# Altium PCB BOARD_2LAYER.PcbDoc (part 7 of 7)
Units mil, origin at the board's own origin, x right, y up, seen from the top; angles counter-clockwise.
Board outline 7677.17 x 7677.17 mil, 2 copper layers (Top Layer, Bottom Layer), stack 34.252 mil thick; 625 components, 375 nets, 1924 pads, 450 vias.
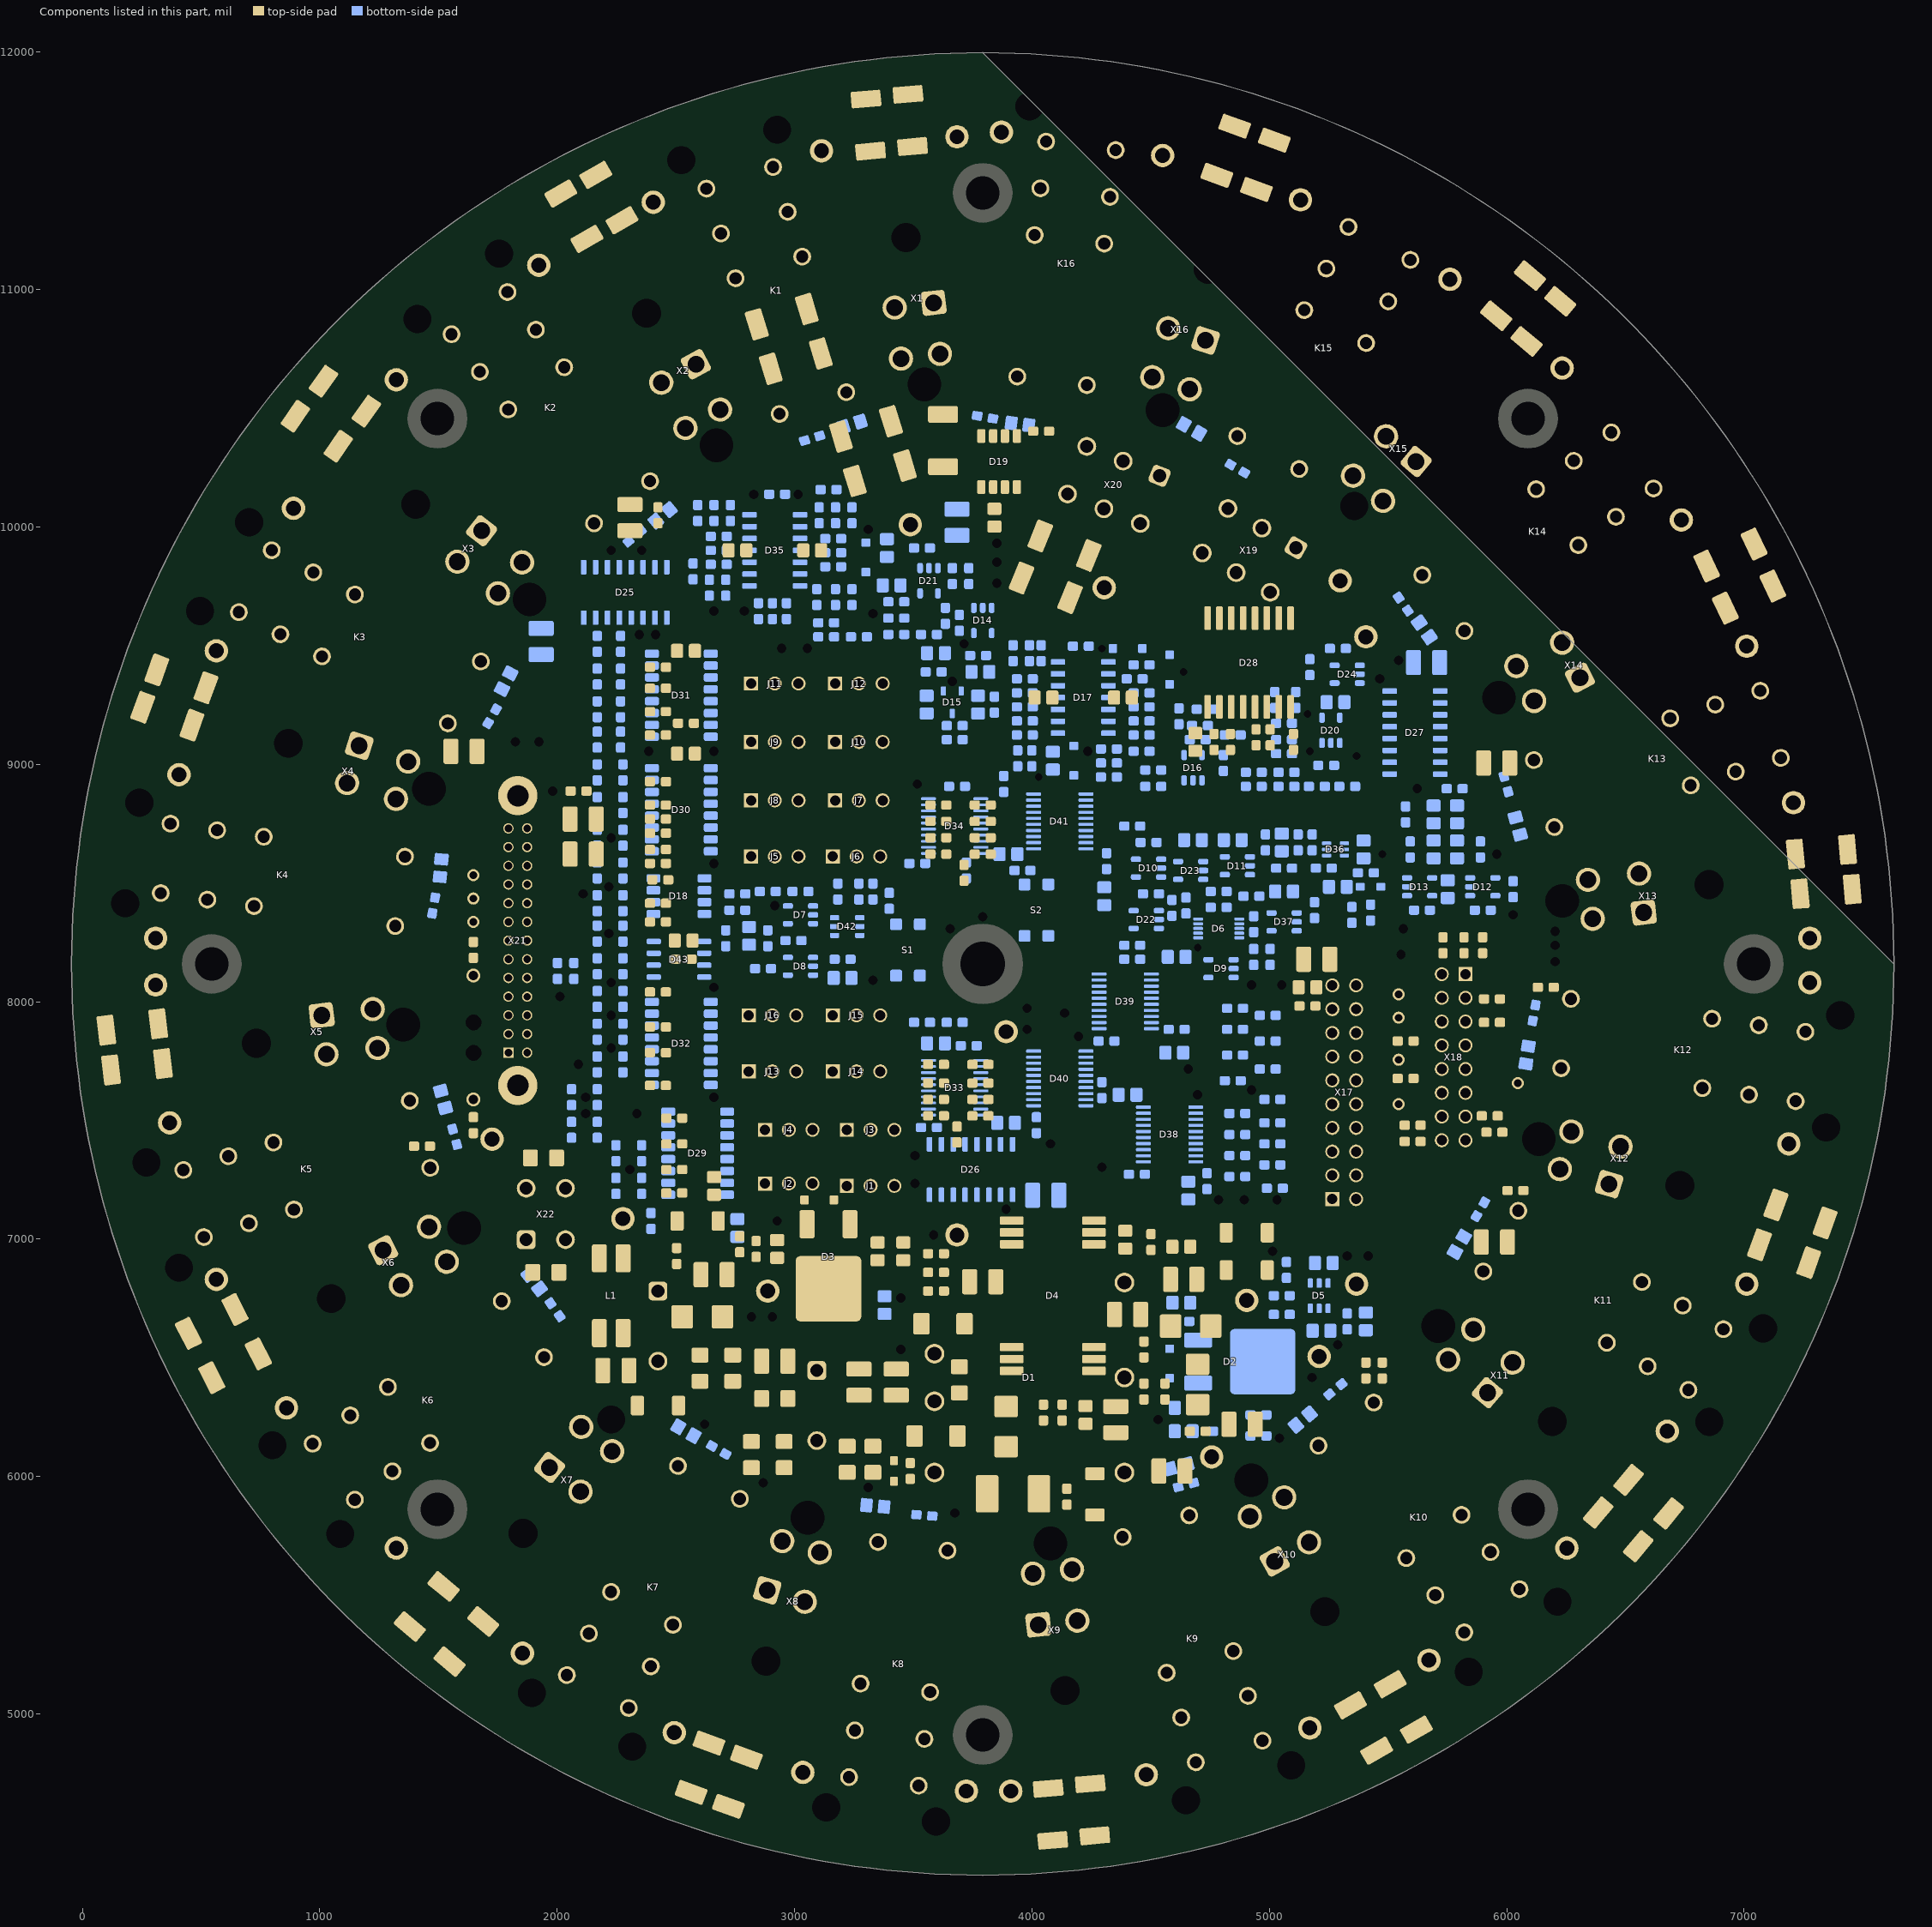
[diagram p7: the components of this part, seen from the top]

## Silkscreen, mask and mechanical layers (free items; w line width, h text height) (continued)
Drill Drawing:
  lines w4.72: 1105.46,1846.46 5971.6,1846.46 ; 1105.46,2035.43 5971.6,2035.43 ; 4832.62,5835.43 4862.54,5835.43 ; 4847.58,5820.47 4847.58,5850.39 ; 5021.6,5839.37 5051.52,5839.37 ; 5036.56,5824.41 5036.56,5854.33 ; 1105.46,3.94 1105.46,2224.41 5971.6,2224.41 5971.6,3.94 1105.46,3.94 ; 4830.26,5835.43 ccw(c4847.58,5835.43) 4847.58,5818.11 ccw(c4847.58,5835.43) 4864.9,5835.43 ccw(c4847.58,5835.43) 4847.58,5852.76 ccw(c4847.58,5835.43) 4830.26,5835.43 ; 5019.24,5839.37 ccw(c5036.56,5839.37) 5036.56,5822.05 ccw(c5036.56,5839.37) 5053.88,5839.37 ccw(c5036.56,5839.37) 5036.56,5856.69 ccw(c5036.56,5839.37) 5019.24,5839.37
  text "U" at 3989.31,11732.28 h78.74
  text "U" at 4461.76,11673.23 h78.74
  text "U" at 2926.32,11633.86 h78.74
  text "J" at 3871.2,11624.02 h78.74
  text "J" at 3684.2,11604.33 h78.74
  text "F" at 4059.6,11584.3 h78.74
  text "F" at 4352.68,11548.32 h78.74
  text "J" at 3113.33,11545.28 h78.74
  text "J" at 4550.34,11525.59 h78.74
  text "U" at 2522.78,11505.91 h78.74
  text "F" at 2909.38,11477.12 h78.74
  text "U" at 5327.9,11387.8 h78.74
  text "F" at 4035.42,11387.36 h78.74
  text "F" at 2628.55,11385.88 h78.74
  text "M" at 3792.46,11368.11 h78.74
  text "F" at 4328.5,11351.37 h78.74
  text "J" at 5131.05,11338.58 h78.74
  text "J" at 2404.67,11328.74 h78.74
  text "F" at 2970.7,11288.41 h78.74
  text "F" at 5333.34,11224.48 h78.74
  text "F" at 2689.87,11197.16 h78.74
  text "F" at 4011.24,11190.41 h78.74
  text "V" at 3468.65,11180.12 h78.74
  text "U" at 5751.13,11161.42 h78.74
  text "F" at 4304.31,11154.42 h78.74
  text "U" at 1755.06,11112.2 h78.74
  text "F" at 3032.01,11099.7 h78.74
  text "F" at 5594.05,11085.86 h78.74
  text "J" at 1922.38,11062.99 h78.74
  text "F" at 5240.18,11049.28 h78.74
  text "V" at 4741.5,11045.6 h78.74
  text "F" at 2751.19,11008.45 h78.74
  text "J" at 5760.97,11003.94 h78.74
  text "F" at 1790.54,10950.38 h78.74
  text "F" at 5500.89,10910.66 h78.74
  text "K" at 3585.74,10904.94 h78.74
  text "K" at 3421.62,10884.79 h78.74
  text "F" at 5147.03,10874.08 h78.74
  text "V" at 2376.39,10861.17 h78.74
  text "U" at 1410.57,10836.61 h78.74
  text "K" at 4574.06,10797.81 h78.74
  text "F" at 1909.96,10791.91 h78.74
  text "F" at 1554.72,10772.68 h78.74
  text "K" at 4731.32,10746.71 h78.74
  text "F" at 5407.74,10735.46 h78.74
  text "K" at 3612.13,10690.02 h78.74
  text "K" at 3448.01,10669.86 h78.74
  text "K" at 2584.32,10646.22 h78.74
  text "F" at 2029.37,10633.44 h78.74
  text "J" at 6233.41,10629.92 h78.74
  text "F" at 1674.14,10614.21 h78.74
  text "F" at 3938.02,10594.1 h78.74
  text "K" at 4507.15,10591.87 h78.74
  text "J" at 1321.99,10580.71 h78.74
  text "K" at 2438.32,10568.59 h78.74
  text "W" at 3546.4,10561.02 h78.74
  text "F" at 4231.1,10558.11 h78.74
  text "K" at 4664.41,10540.77 h78.74
  text "F" at 3217.67,10528.31 h78.74
  text "U" at 6499.16,10511.81 h78.74
  text "V" at 5739.71,10509.79 h78.74
  text "F" at 1793.55,10455.74 h78.74
  text "K" at 2685.98,10455.03 h78.74
  text "W" at 4550.34,10452.76 h78.74
  text "F" at 2936.84,10437.07 h78.74
  text "M" at 1495.22,10417.32 h78.74
  text "M" at 6089.71,10417.32 h78.74
  text "K" at 2539.98,10377.4 h78.74
  text "F" at 6440.78,10358.91 h78.74
  text "F" at 4864.97,10343.62 h78.74
  text "K" at 5491.64,10342.77 h78.74
  text "W" at 2670.42,10305.12 h78.74
  text "G" at 4230.89,10300.12 h78.74
  text "F" at 6282.31,10239.5 h78.74
  text "G" at 4384.2,10238.18 h78.74
  text "K" at 5618.3,10236.49 h78.74
  text "F" at 5125.69,10205 h78.74
  text "K" at 5352.45,10176.9 h78.74
  text "G" at 4537.52,10176.24 h78.74
  text "F" at 2390.94,10153.63 h78.74
  text "U" at 6774.75,10147.64 h78.74
  text "F" at 6618.48,10123.1 h78.74
  text "F" at 6123.84,10120.08 h78.74
  text "A" at 2658.61,10100.39 h78.74
  text "A" at 3686.16,10100.39 h78.74
  text "G" at 4149.77,10099.35 h78.74
  text "R" at 2827.9,10098.43 h78.74
  text "R" at 3014.9,10098.43 h78.74
  text "K" at 5479.12,10070.61 h78.74
  text "V" at 1403.9,10056.59 h78.74
  text "U" at 5357.42,10049.21 h78.74
  text "J" at 888.92,10039.37 h78.74
  text "G" at 4825.44,10038.64 h78.74
  text "G" at 4303.09,10037.41 h78.74
  text "F" at 6460.02,10003.68 h78.74
  text "J" at 6735.38,9990.16 h78.74
  text "U" at 701.91,9980.32 h78.74
  text "F" at 2155.12,9975.93 h78.74
  text "G" at 4456.4,9975.47 h78.74
  text "J" at 3487.35,9970.47 h78.74
  text "A" at 4064.12,9958.66 h78.74
  text "A" at 4757.03,9958.66 h78.74
  text "G" at 4968.64,9955.97 h78.74
  text "R" at 3310.18,9950.79 h78.74
  text "K" at 1681.28,9944.8 h78.74
  text "A" at 4788.53,9938.98 h78.74
  text "A" at 4048.37,9919.29 h78.74
  text "A" at 3249.16,9903.54 h78.74
  text "A" at 2583.8,9891.73 h78.74
  text "R" at 3851.52,9891.73 h78.74
  text "A" at 4241.28,9887.8 h78.74
  text "F" at 6301.55,9884.27 h78.74
  text "A" at 4032.62,9879.92 h78.74
  text "G" at 5111.85,9873.29 h78.74
  text "A" at 3682.23,9868.11 h78.74
  text "F" at 797.16,9862.61 h78.74
  text "R" at 2227.5,9862.2 h78.74
  text "R" at 2355.46,9862.2 h78.74
  text "A" at 2867.27,9860.24 h78.74
  text "A" at 2965.69,9860.24 h78.74
  text "A" at 2548.37,9852.36 h78.74
  text "G" at 4717.18,9851.12 h78.74
  text "A" at 4225.53,9848.43 h78.74
  text "A" at 5540.5,9848.43 h78.74
  text "A" at 3540.5,9832.68 h78.74
  text "K" at 1579.47,9814.5 h78.74
  text "R" at 3851.52,9812.99 h78.74
  text "K" at 1851.91,9811.49 h78.74
  text "A" at 3489.31,9809.06 h78.74
  text "A" at 4205.85,9805.12 h78.74
  text "A" at 3989.31,9777.56 h78.74
  text "F" at 972.36,9769.45 h78.74
  text "G" at 4860.38,9768.44 h78.74
  text "F" at 5644.03,9758.52 h78.74
  text "A" at 3973.57,9738.19 h78.74
  text "J" at 5298.37,9734.25 h78.74
  text "A" at 2119.24,9726.38 h78.74
  text "A" at 2359.39,9726.38 h78.74
  text "R" at 3851.52,9724.41 h78.74
  text "A" at 4162.54,9710.63 h78.74
  text "J" at 4304.27,9704.72 h78.74
  text "A" at 3953.88,9698.82 h78.74
  text "G" at 5003.58,9685.76 h78.74
  text "K" at 1750.11,9681.19 h78.74
  text "F" at 1147.56,9676.3 h78.74
  text "A" at 2087.74,9675.2 h78.74
  text "A" at 2268.84,9675.2 h78.74
  text "A" at 3660.57,9675.2 h78.74
  text "A" at 2778.68,9671.26 h78.74
  text "A" at 3774.75,9667.32 h78.74
  text "A" at 4142.86,9667.32 h78.74
  text "W" at 1883.01,9655.51 h78.74
  text "A" at 3343.64,9655.51 h78.74
  text "A" at 2158.61,9635.83 h78.74
  text "A" at 2209.79,9635.83 h78.74
  text "A" at 3284.59,9631.89 h78.74
  text "A" at 3532.62,9627.95 h78.74
  text "A" at 4127.11,9627.95 h78.74
  text "A" at 3020.81,9612.2 h78.74
  text "U" at 495.22,9606.3 h78.74
  text "R" at 2660.57,9606.3 h78.74
  text "R" at 2788.53,9606.3 h78.74
  text "F" at 658.53,9601.9 h78.74
  text "R" at 3329.87,9596.46 h78.74
  text "A" at 3853.49,9584.65 h78.74
  text "A" at 3564.12,9549.21 h78.74
  text "A" at 3260.97,9545.28 h78.74
  text "A" at 3910.57,9541.34 h78.74
  text "V" at 6526.9,9530.02 h78.74
  text "F" at 5821.74,9522.7 h78.74
  text "A" at 2111.36,9521.65 h78.74
  text "F" at 833.73,9508.74 h78.74
  text "R" at 2345.61,9507.87 h78.74
  text "R" at 2414.51,9507.87 h78.74
  text "J" at 5406.64,9498.03 h78.74
  text "A" at 3796.4,9482.28 h78.74
  text "K" at 6233.29,9473.21 h78.74
  text "R" at 3713.72,9468.5 h78.74
  text "J" at 7010.97,9458.66 h78.74
  text "R" at 2946.01,9448.82 h78.74
  text "R" at 3054.27,9448.82 h78.74
  text "P" at 4294.43,9448.82 h78.74
  text "J" at 564.12,9438.98 h78.74
  text "A" at 2701.91,9427.17 h78.74
  text "A" at 3512.94,9427.17 h78.74
  text "F" at 1008.93,9415.59 h78.74
  text "U" at 7168.45,9409.45 h78.74
  text "R" at 5544.43,9399.61 h78.74
  text "F" at 1678.02,9394.25 h78.74
  text "A" at 2331.83,9379.92 h78.74
  text "K" at 6040.35,9374.91 h78.74
  text "A" at 2505.06,9372.05 h78.74
  text "A" at 2575.93,9372.05 h78.74
  text "A" at 1932.23,9370.08 h78.74
  text "P" at 4638.92,9350.39 h78.74
  text "A" at 2701.91,9328.74 h78.74
  text "A" at 4713.72,9328.74 h78.74
  text "K" at 6308.36,9325.88 h78.74
  text "R" at 5465.69,9320.87 h78.74
  text "A" at 5764.9,9312.99 h78.74
  text "R" at 3664.51,9311.02 h78.74
  text "A" at 5068.05,9305.12 h78.74
  text "E" at 2816.48,9301.18 h78.74
  text "E" at 2916.48,9301.18 h78.74
  text "E" at 3016.48,9301.18 h78.74
  text "E" at 3170.81,9301.18 h78.74
  text "E" at 3270.81,9301.18 h78.74
  text "E" at 3370.81,9301.18 h78.74
  text "A" at 3768.84,9297.24 h78.74
  text "A" at 3884.98,9289.37 h78.74
  text "A" at 2331.83,9281.5 h78.74
  text "A" at 2505.06,9281.5 h78.74
  text "A" at 4634.98,9277.56 h78.74
  text "A" at 4886.95,9273.62 h78.74
  text "F" at 7068.17,9270.56 h78.74
  text "A" at 5383.01,9269.68 h78.74
  text "A" at 4268.84,9251.97 h78.74
  text "A" at 5194.04,9250 h78.74
  text "A" at 4164.51,9242.13 h78.74
  text "W" at 5967.66,9242.13 h78.74
  text "A" at 4617.27,9240.16 h78.74
  text "K" at 6115.42,9227.58 h78.74
  text "A" at 2701.91,9226.38 h78.74
  text "A" at 5446.01,9218.5 h78.74
  text "A" at 5188.13,9216.54 h78.74
  text "F" at 6878.42,9212.54 h78.74
  text "A" at 4536.56,9206.69 h78.74
  text "A" at 3888.92,9198.82 h78.74
  text "A" at 2501.13,9183.07 h78.74
  text "A" at 2331.83,9179.13 h78.74
  text "P" at 5160.57,9173.23 h78.74
  text "A" at 5331.83,9159.45 h78.74
  text "F" at 6688.66,9154.53 h78.74
  text "A" at 4213.72,9151.57 h78.74
  text "F" at 1539.4,9133.53 h78.74
  text "A" at 4788.53,9131.89 h78.74
  text "A" at 2701.91,9127.95 h78.74
  text "A" at 3558.21,9124.02 h78.74
  text "A" at 3888.92,9116.14 h78.74
  text "A" at 5390.89,9104.33 h78.74
  text "A" at 3812.15,9100.39 h78.74
  text "A" at 2501.13,9088.58 h78.74
  text "A" at 4540.5,9088.58 h78.74
  text "A" at 2331.83,9076.77 h78.74
  text "A" at 5778.68,9070.87 h78.74
  text "A" at 2575.93,9064.96 h78.74
  text "A" at 5162.54,9064.96 h78.74
  text "A" at 3812.15,9061.02 h78.74
  text "R" at 1823.96,9055.12 h78.74
  text "R" at 1922.38,9055.12 h78.74
  text "E" at 2816.48,9055.12 h78.74
  text "E" at 2916.48,9055.12 h78.74
  text "E" at 3016.48,9055.12 h78.74
  text "E" at 3170.81,9055.12 h78.74
  text "E" at 3270.81,9055.12 h78.74
  text "E" at 3370.81,9055.12 h78.74
  text "V" at 866.95,9049.43 h78.74
  text "K" at 1165.83,9039.25 h78.74
  text "A" at 3812.15,9021.65 h78.74
  text "A" at 5331.83,9021.65 h78.74
  text "R" at 2384.98,9015.75 h78.74
  text "R" at 2660.57,9015.75 h78.74
  text "R" at 4235.38,9015.75 h78.74
  text "P" at 5170.42,9015.75 h78.74
  text "A" at 5257.03,9005.91 h78.74
  text "P" at 5367.27,8996.06 h78.74
  text "F" at 7154.5,8988.18 h78.74
  text "A" at 3812.15,8986.22 h78.74
  text "F" at 6114.13,8978.88 h78.74
  text "K" at 1371.77,8972.34 h78.74
  text "A" at 4902.7,8966.54 h78.74
  text "A" at 5001.13,8958.66 h78.74
  text "U" at 7306.24,8956.69 h78.74
  text "A" at 3812.15,8950.79 h78.74
  text "A" at 4603.49,8950.79 h78.74
  text "A" at 2701.91,8946.85 h78.74
  text "A" at 4741.28,8946.85 h78.74
  text "A" at 2768.84,8938.98 h78.74
  text "A" at 3485.38,8938.98 h78.74
  text "F" at 6964.75,8930.17 h78.74
  text "A" at 5331.83,8923.23 h78.74
  text "A" at 4217.66,8919.29 h78.74
  text "J" at 406.64,8917.32 h78.74
  text "A" at 3812.15,8915.35 h78.74
  text "P" at 4028.68,8907.48 h78.74
  text "A" at 5146.79,8907.48 h78.74
  text "A" at 4434.2,8899.61 h78.74
  text "A" at 2331.83,8895.67 h78.74
  text "A" at 4808.21,8889.76 h78.74
  text "A" at 2501.13,8887.8 h78.74
  text "K" at 1114.73,8881.99 h78.74
  text "R" at 3516.87,8877.95 h78.74
  text "F" at 6774.99,8872.16 h78.74
  text "W" at 1459.79,8858.27 h78.74
  text "R" at 5623.17,8858.27 h78.74
  text "A" at 3571.99,8854.33 h78.74
  text "R" at 1981.44,8848.43 h78.74
  text "A" at 2701.91,8844.49 h78.74
  text "A" at 3839.71,8844.49 h78.74
  text "A" at 2564.12,8840.55 h78.74
  text "A" at 4060.18,8832.68 h78.74
  text "L" at 1833.8,8828.74 h78.74
  text "A" at 4351.52,8828.74 h78.74
  text "A" at 4422.39,8828.74 h78.74
  text "A" at 5131.05,8828.74 h78.74
  text "A" at 5434.2,8828.74 h78.74
  text "A" at 5548.37,8828.74 h78.74
  text "K" at 1320.67,8815.08 h78.74
  text "E" at 2816.48,8809.06 h78.74
  text "E" at 2916.48,8809.06 h78.74
  text "E" at 3016.48,8809.06 h78.74
  text "E" at 3170.81,8809.06 h78.74
  text "E" at 3270.81,8809.06 h78.74
  text "E" at 3370.81,8809.06 h78.74
  text "U" at 239.31,8799.21 h78.74
  text "J" at 7207.82,8799.21 h78.74
  text "A" at 2331.83,8797.24 h78.74
  text "A" at 3477.5,8791.34 h78.74
  text "A" at 3717.66,8791.34 h78.74
  text "A" at 2501.13,8789.37 h78.74
  text "A" at 3512.94,8767.72 h78.74
  text "A" at 2701.91,8746.06 h78.74
  text "A" at 3477.5,8740.16 h78.74
  text "A" at 2501.13,8726.38 h78.74
  text "A" at 3717.66,8720.47 h78.74
  text "A" at 3512.94,8716.54 h78.74
  text "A" at 4552.31,8714.57 h78.74
  text "F" at 370.67,8710.98 h78.74
  text "A" at 4345.61,8702.76 h78.74
  text "A" at 4603.49,8698.82 h78.74
  text "A" at 5516.87,8698.82 h78.74
  text "A" at 5883.01,8698.82 h78.74
  text "F" at 6200.46,8696.5 h78.74
  text "A" at 2335.77,8694.88 h78.74
  text "C" at 1794.43,8690.94 h78.74
  text "C" at 1873.17,8690.94 h78.74
  text "A" at 3477.5,8688.98 h78.74
  text "F" at 567.16,8683.37 h78.74
  text "A" at 5741.28,8679.13 h78.74
  text "A" at 5351.52,8675.2 h78.74
  text "A" at 2564.12,8671.26 h78.74
  text "A" at 5497.19,8671.26 h78.74
  text "A" at 3512.94,8665.35 h78.74
  text "F" at 763.66,8655.75 h78.74
  text "A" at 3717.66,8653.54 h78.74
  text "R" at 2227.5,8651.57 h78.74
  text "A" at 2701.91,8643.7 h78.74
  text "A" at 4934.2,8643.7 h78.74
  text "A" at 4760.97,8641.73 h78.74
  text "A" at 3477.5,8637.8 h78.74
  text "A" at 5473.57,8624.02 h78.74
  text "C" at 1794.43,8612.2 h78.74
  text "C" at 1873.17,8612.2 h78.74
  text "A" at 3509,8610.24 h78.74
  text "A" at 4926.32,8604.33 h78.74
  text "A" at 4544.43,8592.52 h78.74
  text "P" at 5475.53,8582.68 h78.74
  text "R" at 5957.82,8582.68 h78.74
  text "E" at 2816.48,8572.83 h78.74
  text "E" at 2916.48,8572.83 h78.74
  text "E" at 3016.48,8572.83 h78.74
  text "E" at 3160.97,8572.83 h78.74
  text "E" at 3260.97,8572.83 h78.74
  text "E" at 3360.97,8572.83 h78.74
  text "F" at 1358.6,8572.14 h78.74
  text "A" at 3993.25,8568.9 h78.74
  text "A" at 4229.47,8566.93 h78.74
  text "A" at 5638.92,8564.96 h78.74
  text "A" at 5150.73,8561.02 h78.74
  text "A" at 2501.13,8545.28 h78.74
  text "A" at 4264.9,8545.28 h78.74
  text "A" at 5343.64,8545.28 h78.74
  text "R" at 2660.57,8543.31 h78.74
  text "A" at 3784.59,8539.37 h78.74
  text "C" at 1794.43,8533.46 h78.74
  text "C" at 1873.17,8533.46 h78.74
  text "A" at 4036.56,8533.46 h78.74
  text "A" at 4682.23,8529.53 h78.74
  text "A" at 5953.88,8529.53 h78.74
  text "A" at 5642.86,8521.65 h78.74
  text "A" at 5753.09,8519.68 h78.74
  text "A" at 2331.83,8517.72 h78.74
  text "A" at 4430.26,8517.72 h78.74
  text "A" at 5575.93,8513.78 h78.74
  text "A" at 5810.18,8513.78 h78.74
  text "A" at 6026.72,8513.78 h78.74
  text "A" at 3591.68,8501.97 h78.74
  text "A" at 3627.11,8501.97 h78.74
  text "A" at 3662.54,8501.97 h78.74
  text "A" at 4052.31,8501.97 h78.74
  text "K" at 6557.17,8500.77 h78.74
  text "C" at 1646.79,8494.09 h78.74
  text "A" at 2674.35,8482.28 h78.74
  text "K" at 6342.25,8474.38 h78.74
  text "A" at 3764.9,8472.44 h78.74
  text "A" at 4977.5,8470.47 h78.74
  text "A" at 3032.62,8466.54 h78.74
  text "A" at 4918.45,8462.6 h78.74
  text "C" at 1794.43,8454.72 h78.74
  text "C" at 1873.17,8454.72 h78.74
  text "V" at 6852.51,8453.73 h78.74
  text "A" at 4568.05,8446.85 h78.74
  text "R" at 2217.66,8444.88 h78.74
  text "A" at 4694.04,8442.91 h78.74
  text "A" at 4611.36,8440.94 h78.74
  text "A" at 5150.73,8427.17 h78.74
  text "A" at 3144.83,8423.23 h78.74
  text "F" at 329.57,8418.58 h78.74
  text "R" at 2109.39,8415.35 h78.74
  text "A" at 2331.83,8399.61 h78.74
  text "A" at 4024.75,8399.61 h78.74
  text "C" at 1646.79,8395.67 h78.74
  text "A" at 5383.01,8395.67 h78.74
  text "A" at 3223.57,8391.73 h78.74
  text "F" at 526.07,8390.96 h78.74
  text "A" at 2674.35,8387.8 h78.74
  text "W" at 6233.41,8385.83 h78.74
  text "A" at 2855.46,8383.86 h78.74
  text "A" at 3977.5,8379.92 h78.74
  text "U" at 180.26,8375.98 h78.74
  text "C" at 1794.43,8375.98 h78.74
  text "C" at 1873.17,8375.98 h78.74
  text "A" at 2501.13,8375.98 h78.74
  text "A" at 4997.19,8375.98 h78.74
  text "A" at 4930.26,8368.11 h78.74
  text "R" at 2916.48,8366.14 h78.74
  text "A" at 4024.75,8364.17 h78.74
  text "F" at 722.56,8363.35 h78.74
  text "A" at 4697.98,8352.36 h78.74
  text "A" at 2835.77,8348.43 h78.74
  text "A" at 5729.47,8348.43 h78.74
  text "A" at 3449.94,8340.55 h78.74
  text "A" at 4871.2,8336.61 h78.74
  text "K" at 6577.32,8336.65 h78.74
  text "A" at 4024.75,8328.74 h78.74
  text "R" at 6026.72,8326.77 h78.74
  text "R" at 3792.46,8319.06 h78.74
  text "A" at 4064.12,8312.99 h78.74
  text "A" at 5229.47,8312.99 h78.74
  text "K" at 6362.4,8310.26 h78.74
  text "A" at 2886.95,8305.12 h78.74
  text "A" at 4493.25,8305.12 h78.74
  text "C" at 1646.79,8297.24 h78.74
  text "C" at 1794.43,8297.24 h78.74
  text "C" at 1873.17,8297.24 h78.74
  text "A" at 2501.13,8297.24 h78.74
  text "A" at 2753.09,8297.24 h78.74
  text "A" at 2335.77,8293.31 h78.74
  text "A" at 4390.89,8293.31 h78.74
  text "A" at 4658.61,8281.5 h78.74
  text "F" at 1317.5,8279.73 h78.74
  text "A" at 3318.05,8279.53 h78.74
  text "A" at 2123.17,8277.56 h78.74
  text "A" at 5914.51,8277.56 h78.74
  text "A" at 4619.24,8273.62 h78.74
  text "A" at 2556.24,8269.68 h78.74
  text "R" at 3654.67,8267.72 h78.74
  text "R" at 5564.12,8267.72 h78.74
  text "A" at 3375.14,8265.75 h78.74
  text "A" at 3079.87,8257.87 h78.74
  text "R" at 6203.88,8257.87 h78.74
  text "A" at 5296.4,8250 h78.74
  text "R" at 2217.66,8248.03 h78.74
  text "A" at 3347.58,8244.09 h78.74
  text "A" at 2095.61,8238.19 h78.74
  text "A" at 3524.75,8238.19 h78.74
  text "A" at 4516.87,8230.32 h78.74
  text "A" at 4615.3,8230.32 h78.74
  text "J" at 308.21,8228.35 h78.74
  text "J" at 7276.72,8228.35 h78.74
  text "A" at 5111.36,8222.44 h78.74
  text "C" at 1794.43,8218.5 h78.74
  text "C" at 1873.17,8218.5 h78.74
  text "A" at 3564.12,8214.57 h78.74
  text "A" at 4871.2,8202.76 h78.74
  text "A" at 4568.05,8198.82 h78.74
  text "R" at 6203.88,8198.82 h78.74
  text "A" at 2351.52,8190.94 h78.74
  text "A" at 4064.12,8190.94 h78.74
  text "A" at 4099.55,8190.94 h78.74
  text "A" at 4260.97,8190.94 h78.74
  text "A" at 4347.58,8190.94 h78.74
  text "P" at 4697.98,8188.98 h78.74
  text "A" at 4028.68,8187.01 h78.74
  text "A" at 5367.27,8187.01 h78.74
  text "A" at 2020.81,8167.32 h78.74
  text "A" at 2071.99,8167.32 h78.74
  text "A" at 4894.83,8159.45 h78.74
  text "R" at 5554.27,8159.45 h78.74
  text "A" at 4507.03,8153.54 h78.74
  text "A" at 4701.91,8147.64 h78.74
  text "C" at 1794.43,8139.76 h78.74
  text "C" at 1873.17,8139.76 h78.74
  text "A" at 3280.65,8139.76 h78.74
  text "A" at 2351.52,8135.83 h78.74
  text "R" at 6203.88,8129.92 h78.74
  text "M" at 544.43,8120.08 h78.74
  text "A" at 3528.68,8120.08 h78.74
  text "N" at 3792.46,8120.08 h78.74
  text "M" at 7040.5,8120.08 h78.74
  text "A" at 4001.13,8112.2 h78.74
  text "A" at 4036.56,8112.2 h78.74
  text "A" at 4284.59,8106.3 h78.74
  text "A" at 2788.53,8096.46 h78.74
  text "A" at 3375.14,8092.52 h78.74
  text "E" at 5726.32,8077.17 h78.74
  text "E" at 5826.32,8077.17 h78.74
  text "D" at 1646.79,8070.87 h78.74
  text "A" at 4005.06,8068.9 h78.74
  text "A" at 5571.99,8068.9 h78.74
  text "A" at 5611.36,8068.9 h78.74
  text "A" at 2457.82,8064.96 h78.74
  text "A" at 2682.23,8064.96 h78.74
  text "C" at 1794.43,8061.02 h78.74
  text "C" at 1873.17,8061.02 h78.74
  text "R" at 3329.87,8051.18 h78.74
  text "A" at 4969.63,8045.28 h78.74
  text "R" at 2227.5,8041.34 h78.74
  text "J" at 7276.72,8041.34 h78.74
  text "A" at 3111.36,8033.46 h78.74
  text "J" at 308.21,8031.5 h78.74
  text "R" at 4924.35,8031.5 h78.74
  text "R" at 5052.31,8031.5 h78.74
  text "A" at 4804.27,8029.53 h78.74
  text "E" at 5265.3,8029.53 h78.74
  text "E" at 5365.3,8029.53 h78.74
  text "R" at 2660.57,8021.65 h78.74
  text "A" at 2068.05,8013.78 h78.74
  text "A" at 2560.18,8013.78 h78.74
  text "A" at 2331.83,8001.97 h78.74
  text "A" at 2501.13,8001.97 h78.74
  text "C" at 5544.43,7992.13 h78.74
  text "A" at 2883.01,7990.16 h78.74
  text "C" at 1794.43,7982.28 h78.74
  text "C" at 1873.17,7982.28 h78.74
  text "R" at 2010.97,7982.28 h78.74
  text "E" at 5726.32,7977.17 h78.74
  text "E" at 5826.32,7977.17 h78.74
  text "F" at 6270.29,7973.02 h78.74
  text "A" at 2697.98,7962.6 h78.74
  text "A" at 3497.19,7950.79 h78.74
  text "A" at 3532.62,7950.79 h78.74
  text "A" at 3568.05,7950.79 h78.74
  text "A" at 2060.18,7942.91 h78.74
  text "R" at 3979.47,7933.07 h78.74
  text "A" at 4406.64,7931.1 h78.74
  text "K" at 1222.53,7929.9 h78.74
  text "E" at 5265.3,7929.53 h78.74
  text "E" at 5365.3,7929.53 h78.74
  text "A" at 3650.73,7915.35 h78.74
  text "R" at 4136.95,7913.39 h78.74
  text "A" at 2060.18,7907.48 h78.74
  text "A" at 3741.28,7907.48 h78.74
  text "K" at 1007.6,7903.51 h78.74
  text "C" at 1794.43,7903.54 h78.74
  text "C" at 1873.17,7903.54 h78.74
  text "R" at 2227.5,7903.54 h78.74
  text "E" at 2806.64,7903.54 h78.74
  text "E" at 2906.64,7903.54 h78.74
  text "E" at 3006.64,7903.54 h78.74
  text "E" at 3160.97,7903.54 h78.74
  text "E" at 3260.97,7903.54 h78.74
  text "E" at 3360.97,7903.54 h78.74
  text "U" at 7404.67,7903.54 h78.74
  text "C" at 5544.43,7893.7 h78.74
  text "F" at 6865.23,7889.41 h78.74
  text "E" at 5726.32,7877.17 h78.74
  text "E" at 5826.32,7877.17 h78.74
  text "T" at 1646.79,7874.02 h78.74
  text "A" at 2060.18,7868.11 h78.74
  text "A" at 4347.58,7868.11 h78.74
  text "W" at 1351.52,7864.17 h78.74
  text "F" at 7061.72,7861.79 h78.74
  text "A" at 2697.98,7860.24 h78.74
  text "A" at 2331.83,7856.3 h78.74
  text "A" at 2501.13,7856.3 h78.74
  text "A" at 3237.35,7852.36 h78.74
  text "A" at 3308.21,7852.36 h78.74
  text "A" at 3410.57,7852.36 h78.74
  text "A" at 3449.94,7852.36 h78.74
  text "A" at 4383.01,7852.36 h78.74
  text "R" at 3979.47,7844.49 h78.74
  text "J" at 3890.89,7834.65 h78.74
  text "F" at 7258.21,7834.18 h78.74
  text "E" at 5265.3,7829.53 h78.74
  text "E" at 5365.3,7829.53 h78.74
  text "C" at 1794.43,7824.8 h78.74
  text "C" at 1873.17,7824.8 h78.74
  text "A" at 3768.84,7816.93 h78.74
  text "R" at 4196.01,7814.96 h78.74
  text "A" at 4644.83,7801.18 h78.74
  text "V" at 732.42,7786.43 h78.74
  text "A" at 3512.94,7785.43 h78.74
  text "A" at 4005.06,7781.5 h78.74
  text "E" at 5726.32,7777.17 h78.74
  text "E" at 5826.32,7777.17 h78.74
  text "K" at 1242.68,7765.78 h78.74
  text "R" at 2227.5,7765.75 h78.74
  text "A" at 2697.98,7761.81 h78.74
  text "T" at 1646.79,7746.06 h78.74
  text "C" at 1794.43,7746.06 h78.74
  text "C" at 1873.17,7746.06 h78.74
  text "A" at 2331.83,7746.06 h78.74
  text "A" at 2505.06,7746.06 h78.74
  text "K" at 1027.76,7739.39 h78.74
  text "E" at 5265.3,7729.53 h78.74
  text "E" at 5365.3,7729.53 h78.74
  text "C" at 5544.43,7716.54 h78.74
  text "A" at 3701.91,7698.82 h78.74
  text "R" at 2089.71,7696.85 h78.74
  text "A" at 3481.44,7687.01 h78.74
  text "F" at 6229.19,7680.62 h78.74
  text "R" at 4658.61,7677.17 h78.74
  text "E" at 5726.32,7677.17 h78.74
  text "E" at 5826.32,7677.17 h78.74
  text "A" at 4371.2,7675.2 h78.74
  text "A" at 4406.64,7675.2 h78.74
  text "A" at 4446.01,7675.2 h78.74
  text "A" at 4296.4,7671.26 h78.74
  text "E" at 2806.64,7667.32 h78.74
  text "E" at 2906.64,7667.32 h78.74
  text "E" at 3006.64,7667.32 h78.74
  text "E" at 3160.97,7667.32 h78.74
  text "E" at 3260.97,7667.32 h78.74
  text "E" at 3360.97,7667.32 h78.74
  text "A" at 3509,7663.39 h78.74
  text "A" at 2697.98,7659.45 h78.74
  text "A" at 5438.13,7643.7 h78.74
  text "A" at 3481.44,7635.83 h78.74
  text "E" at 5265.3,7629.53 h78.74
  text "E" at 5365.3,7629.53 h78.74
  text "A" at 3701.91,7620.08 h78.74
  text "A" at 4335.77,7620.08 h78.74
  text "C" at 6046.4,7618.11 h78.74
  text "A" at 2331.83,7612.2 h78.74
  text "A" at 3512.94,7612.2 h78.74
  text "L" at 1833.8,7608.27 h78.74
  text "A" at 2501.13,7608.27 h78.74
  text "A" at 2713.72,7608.27 h78.74
  text "A" at 5438.13,7600.39 h78.74
  text "F" at 6824.13,7597.01 h78.74
  text "R" at 4924.35,7588.58 h78.74
  text "A" at 3481.44,7584.65 h78.74
  text "E" at 5726.32,7577.17 h78.74
  text "E" at 5826.32,7577.17 h78.74
  text "R" at 4697.98,7568.9 h78.74
  text "F" at 7020.63,7569.39 h78.74
  text "A" at 3512.94,7561.02 h78.74
  text "R" at 2119.24,7559.06 h78.74
  text "R" at 2660.57,7559.06 h78.74
  text "A" at 5438.13,7557.09 h78.74
  text "D" at 1646.79,7549.21 h78.74
  text "A" at 3701.91,7549.21 h78.74
  text "F" at 1378.96,7543.66 h78.74
  text "F" at 7217.12,7541.77 h78.74
  text "A" at 3481.44,7533.46 h78.74
  text "E" at 5265.3,7529.53 h78.74
  text "E" at 5365.3,7529.53 h78.74
  text "C" at 5544.43,7529.53 h78.74
  text "A" at 4406.64,7517.72 h78.74
  text "A" at 5438.13,7513.78 h78.74
  text "A" at 3512.94,7509.84 h78.74
  text "A" at 4304.27,7509.84 h78.74
  text "A" at 2768.84,7498.03 h78.74
  text "R" at 2119.24,7490.16 h78.74
  text "R" at 2335.77,7490.16 h78.74
  text "A" at 3701.91,7482.28 h78.74
  text "E" at 5726.32,7477.17 h78.74
  text "E" at 5826.32,7477.17 h78.74
  text "A" at 2410.57,7474.41 h78.74
  text "A" at 2568.05,7470.47 h78.74
  text "A" at 5438.13,7470.47 h78.74
  text "J" at 367.27,7450.79 h78.74
  text "A" at 3977.5,7450.79 h78.74
  text "A" at 5438.13,7431.1 h78.74
  text "U" at 7345.61,7431.1 h78.74
  text "E" at 5265.3,7429.53 h78.74
  text "E" at 5365.3,7429.53 h78.74
  text "A" at 3642.86,7427.17 h78.74
  text "E" at 2875.53,7421.26 h78.74
  text "E" at 2975.53,7421.26 h78.74
  text "E" at 3075.53,7421.26 h78.74
  text "E" at 3220.02,7421.26 h78.74
  text "E" at 3320.02,7421.26 h78.74
  text "E" at 3420.02,7421.26 h78.74
  text "K" at 6272.15,7413.87 h78.74
  text "A" at 2768.84,7399.61 h78.74
  text "A" at 5438.13,7391.73 h78.74
  text "J" at 1725.53,7381.89 h78.74
  text "W" at 6134.98,7381.89 h78.74
  text "E" at 5726.32,7377.17 h78.74
  text "E" at 5826.32,7377.17 h78.74
  text "F" at 804.42,7368 h78.74
  text "A" at 2410.57,7364.17 h78.74
  text "A" at 4016.87,7364.17 h78.74
  text "R" at 4077.9,7362.2 h78.74
  text "J" at 7188.13,7362.2 h78.74
  text "A" at 2568.05,7360.24 h78.74
  text "A" at 3953.88,7360.24 h78.74
  text "A" at 5438.13,7352.36 h78.74
  text "K" at 6479.23,7350.56 h78.74
  text "E" at 5265.3,7329.53 h78.74
  text "E" at 5365.3,7329.53 h78.74
  text "R" at 3507.03,7312.99 h78.74
  text "F" at 614.67,7309.99 h78.74
  text "A" at 2772.78,7297.24 h78.74
  text "A" at 3568.05,7297.24 h78.74
  text "U" at 268.84,7283.46 h78.74
  text "A" at 3697.98,7273.62 h78.74
  text "R" at 4294.43,7263.78 h78.74
  text "F" at 1465.29,7261.28 h78.74
  text "A" at 3623.17,7257.87 h78.74
  text "K" at 6223.81,7255.74 h78.74
  text "R" at 2306.24,7253.94 h78.74
  text "A" at 2568.05,7253.94 h78.74
  text "A" at 4692.07,7253.94 h78.74
  text "F" at 424.91,7251.97 h78.74
  text "A" at 2410.57,7250 h78.74
  text "A" at 3697.98,7238.19 h78.74
  text "A" at 4363.33,7238.19 h78.74
  text "E" at 5265.3,7229.53 h78.74
  text "E" at 5365.3,7229.53 h78.74
  text "A" at 2780.65,7194.88 h78.74
  text "E" at 2875.53,7194.88 h78.74
  text "E" at 2975.53,7194.88 h78.74
  text "E" at 3075.53,7194.88 h78.74
  text "R" at 3507.03,7194.88 h78.74
  text "K" at 6430.88,7192.43 h78.74
  text "V" at 6729.9,7187.47 h78.74
  text "E" at 3220.02,7185.04 h78.74
  text "E" at 3320.02,7185.04 h78.74
  text "E" at 3420.02,7185.04 h78.74
  text "G" at 1869.24,7175.2 h78.74
  text "G" at 2034.59,7175.2 h78.74
  text "A" at 2568.05,7155.51 h78.74
  text "A" at 2410.57,7151.57 h78.74
  text "A" at 4166.48,7143.7 h78.74
  text "A" at 5701.91,7135.83 h78.74
  text "E" at 5265.3,7129.53 h78.74
  text "E" at 5365.3,7129.53 h78.74
  text "A" at 4715.69,7127.95 h78.74
  text "R" at 4786.56,7125.98 h78.74
  text "R" at 4894.83,7125.98 h78.74
  text "R" at 5032.62,7125.98 h78.74
  text "A" at 2666.48,7096.46 h78.74
  text "A" at 3682.23,7096.46 h78.74
  text "A" at 3733.41,7096.46 h78.74
  text "R" at 3890.89,7086.61 h78.74
  text "F" at 890.75,7085.63 h78.74
  text "F" at 6049.01,7080.39 h78.74
  text "A" at 2516.87,7061.02 h78.74
  text "A" at 2666.48,7049.21 h78.74
  text "J" at 2276.72,7047.24 h78.74
  text "R" at 2926.32,7037.4 h78.74
  text "F" at 701,7027.61 h78.74
  text "A" at 2993.25,7025.59 h78.74
  text "A" at 2516.87,7013.78 h78.74
  text "A" at 2666.48,7013.78 h78.74
  text "K" at 1459.66,7012.58 h78.74
  text "W" at 1607.42,7007.87 h78.74
  text "R" at 3585.77,6978.35 h78.74
  text "J" at 3684.2,6978.35 h78.74
  text "A" at 5469.63,6974.41 h78.74
  text "F" at 511.24,6969.6 h78.74
  text "A" at 5516.87,6970.47 h78.74
  text "A" at 2977.5,6962.6 h78.74
  text "G" at 1869.24,6958.66 h78.74
  text "G" at 2034.59,6958.66 h78.74
  text "A" at 4335.77,6931.1 h78.74
  text "B" at 5170.42,6931.1 h78.74
  text "A" at 4453.88,6919.29 h78.74
  text "K" at 1266.73,6914.28 h78.74
  text "R" at 5012.94,6909.45 h78.74
  text "A" at 4729.47,6903.54 h78.74
  text "A" at 4764.9,6903.54 h78.74
  text "R" at 5327.9,6889.76 h78.74
  text "R" at 5416.48,6889.76 h78.74
  text "A" at 3032.62,6872.05 h78.74
  text "A" at 3075.93,6872.05 h78.74
  text "A" at 3123.17,6872.05 h78.74
  text "A" at 3170.42,6872.05 h78.74
  text "A" at 3213.72,6872.05 h78.74
  text "A" at 3260.97,6872.05 h78.74
  text "A" at 4729.47,6868.11 h78.74
  text "A" at 4764.9,6868.11 h78.74
  text "K" at 1534.73,6865.25 h78.74
  text "A" at 3733.41,6864.17 h78.74
  text "A" at 3776.72,6864.17 h78.74
  text "U" at 406.64,6840.55 h78.74
  text "A" at 3398.76,6824.8 h78.74
  text "F" at 5901.37,6824.68 h78.74
  text "A" at 3032.62,6820.87 h78.74
  text "A" at 3075.93,6820.87 h78.74
  text "A" at 3123.17,6820.87 h78.74
  text "A" at 3170.42,6820.87 h78.74
  text "A" at 3213.72,6820.87 h78.74
  text "A" at 3260.97,6820.87 h78.74
  text "J" at 564.12,6791.34 h78.74
  text "A" at 3509,6781.5 h78.74
  text "F" at 6569.3,6780 h78.74
  text "H" at 4389.31,6777.95 h78.74
  text "J" at 5367.27,6771.65 h78.74
  text "J" at 7010.97,6771.65 h78.74
  text "A" at 3032.62,6769.69 h78.74
  text "A" at 3075.93,6769.69 h78.74
  text "A" at 3123.17,6769.69 h78.74
  text "A" at 3170.42,6769.69 h78.74
  text "A" at 3213.72,6769.69 h78.74
  text "A" at 3260.97,6769.69 h78.74
  text "K" at 1341.8,6766.95 h78.74
  text "A" at 3379.08,6765.75 h78.74
  text "A" at 4749.16,6765.75 h78.74
  text "A" at 4796.4,6765.75 h78.74
  text "G" at 2424.35,6742.13 h78.74
  text "J" at 2886.95,6742.13 h78.74
  text "A" at 4749.16,6726.38 h78.74
  text "A" at 4796.4,6726.38 h78.74
  text "A" at 3032.62,6718.5 h78.74
  text "A" at 3075.93,6718.5 h78.74
  text "A" at 3123.17,6718.5 h78.74
  text "A" at 3170.42,6718.5 h78.74
  text "A" at 3213.72,6718.5 h78.74
  text "A" at 3260.97,6718.5 h78.74
  text "R" at 3447.98,6712.6 h78.74
  text "V" at 1048.19,6710.13 h78.74
  text "J" at 4904.67,6702.76 h78.74
  text "F" at 1766.42,6699.51 h78.74
  text "F" at 6741.15,6680.79 h78.74
  text "A" at 3032.62,6675.2 h78.74
  text "A" at 3075.93,6675.2 h78.74
  text "A" at 3123.17,6675.2 h78.74
  text "A" at 3170.42,6675.2 h78.74
  text "A" at 3213.72,6675.2 h78.74
  text "A" at 3260.97,6675.2 h78.74
  text "A" at 4973.57,6643.7 h78.74
  text "A" at 3032.62,6635.83 h78.74
  text "A" at 3075.93,6635.83 h78.74
  text "A" at 3123.17,6635.83 h78.74
  text "A" at 3170.42,6635.83 h78.74
  text "A" at 3213.72,6635.83 h78.74
  text "A" at 3260.97,6635.83 h78.74
  text "R" at 2818.05,6633.86 h78.74
  text "R" at 2906.64,6633.86 h78.74
  text "A" at 5209.79,6627.95 h78.74
  text "W" at 5711.76,6594.49 h78.74
  text "U" at 7079.87,6584.65 h78.74
  text "F" at 6912.99,6581.57 h78.74
  text "K" at 5859.13,6579.78 h78.74
  text "A" at 4859.39,6564.96 h78.74
  text "A" at 4898.76,6564.96 h78.74
  text "A" at 4949.94,6564.96 h78.74
  text "A" at 4997.19,6564.96 h78.74
  text "A" at 5048.37,6564.96 h78.74
  text "A" at 5091.68,6564.96 h78.74
  text "G" at 2424.35,6545.28 h78.74
  text "A" at 5335.77,6529.53 h78.74
  text "F" at 6421.67,6524.28 h78.74
  text "R" at 5288.53,6515.75 h78.74
  text "A" at 4859.39,6513.78 h78.74
  text "A" at 4898.76,6513.78 h78.74
  text "A" at 4949.94,6513.78 h78.74
  text "A" at 4997.19,6513.78 h78.74
  text "A" at 5048.37,6513.78 h78.74
  text "A" at 5091.68,6513.78 h78.74
  text "A" at 4343.64,6505.91 h78.74
  text "R" at 3447.98,6496.06 h78.74
  text "H" at 3589.31,6477.95 h78.74
  text "A" at 4859.39,6466.54 h78.74
  text "A" at 4898.76,6466.54 h78.74
  text "A" at 4949.94,6466.54 h78.74
  text "A" at 4997.19,6466.54 h78.74
  text "A" at 5048.37,6466.54 h78.74
  text "A" at 5091.68,6466.54 h78.74
  text "J" at 5209.79,6466.54 h78.74
  text "F" at 1944.12,6463.69 h78.74
  text "A" at 4343.64,6454.72 h78.74
  text "K" at 5752.84,6453.11 h78.74
  text "G" at 2424.35,6446.85 h78.74
  text "K" at 6025,6440.59 h78.74
  text "F" at 6593.51,6425.07 h78.74
  text "A" at 4859.39,6423.23 h78.74
  text "A" at 4898.76,6423.23 h78.74
  text "A" at 4949.94,6423.23 h78.74
  text "A" at 4997.19,6423.23 h78.74
  text "A" at 5048.37,6423.23 h78.74
  text "A" at 5091.68,6423.23 h78.74
  text "G" at 3093.64,6407.48 h78.74
  text "A" at 4473.57,6407.48 h78.74
  text "H" at 4389.31,6377.95 h78.74
  text "R" at 5180.26,6377.95 h78.74
  text "A" at 4859.39,6375.98 h78.74
  text "A" at 4898.76,6375.98 h78.74
  text "A" at 4949.94,6375.98 h78.74
  text "A" at 4997.19,6375.98 h78.74
  text "A" at 5048.37,6375.98 h78.74
  text "A" at 5091.68,6375.98 h78.74
  text "F" at 1286.61,6337.95 h78.74
  text "A" at 4859.39,6332.68 h78.74
  text "A" at 4898.76,6332.68 h78.74
  text "A" at 4949.94,6332.68 h78.74
  text "A" at 4997.19,6332.68 h78.74
  text "A" at 5048.37,6332.68 h78.74
  text "A" at 5091.68,6332.68 h78.74
  text "F" at 6765.35,6325.86 h78.74
  text "K" at 5918.71,6313.92 h78.74
  text "H" at 3589.31,6277.95 h78.74
  text "F" at 5439.63,6272.58 h78.74
  text "A" at 4886.95,6253.94 h78.74
  text "J" at 859.39,6250 h78.74
  text "F" at 1128.14,6218.53 h78.74
  text "G" at 3093.64,6210.63 h78.74
  text "U" at 2227.5,6200.79 h78.74
  text "R" at 4530.65,6200.79 h78.74
  text "V" at 6192.02,6192.52 h78.74
  text "U" at 6853.49,6190.94 h78.74
  text "R" at 2621.2,6181.1 h78.74
  text "K" at 2101.06,6169.68 h78.74
  text "J" at 6676.32,6151.57 h78.74
  text "A" at 4221.6,6135.83 h78.74
  text "A" at 3753.09,6131.89 h78.74
  text "A" at 4083.8,6127.95 h78.74
  text "R" at 5042.46,6122.05 h78.74
  text "G" at 3093.64,6112.2 h78.74
  text "F" at 1464.31,6102.13 h78.74
  text "F" at 969.67,6099.12 h78.74
  text "U" at 800.34,6092.52 h78.74
  text "F" at 5206.95,6090.79 h78.74
  text "K" at 2231.36,6067.88 h78.74
  text "J" at 4757.03,6043.31 h78.74
  text "F" at 2508.78,6005.31 h78.74
  text "K" at 1967.74,5999.05 h78.74
  text "F" at 1305.84,5982.72 h78.74
  text "H" at 3589.31,5977.95 h78.74
  text "H" at 4389.31,5977.95 h78.74
  text "A" at 4174.35,5970.47 h78.74
  text "W" at 4924.35,5944.88 h78.74
  text "R" at 2867.27,5935.04 h78.74
  text "R" at 3310.18,5915.35 h78.74
  text "K" at 2098.04,5897.25 h78.74
  text "K" at 5062.29,5872.96 h78.74
  text "F" at 2769.49,5866.69 h78.74
  text "F" at 1147.37,5863.3 h78.74
  text "M" at 1495.22,5822.83 h78.74
  text "M" at 6089.71,5822.83 h78.74
  text "R" at 3674.35,5807.09 h78.74
  text "F" at 5809.51,5799.16 h78.74
  text "F" at 4662.6,5797.13 h78.74
  text "K" at 4917.66,5792.8 h78.74
  text "W" at 3054.27,5787.4 h78.74
  text "V" at 1855.95,5721.67 h78.74
  text "U" at 1085.77,5718.5 h78.74
  text "F" at 4381.77,5705.89 h78.74
  text "K" at 2947.81,5688.73 h78.74
  text "F" at 3351.08,5684.8 h78.74
  text "K" at 5167.26,5683.58 h78.74
  text "W" at 4077.9,5679.13 h78.74
  text "J" at 1321.99,5659.45 h78.74
  text "J" at 6253.09,5659.45 h78.74
  text "F" at 3644.15,5648.81 h78.74
  text "F" at 5931.67,5642.79 h78.74
  text "K" at 3105.94,5640.39 h78.74
  text "F" at 5576.83,5617.37 h78.74
  text "K" at 5022.64,5603.41 h78.74
  text "K" at 4168.49,5569.07 h78.74
  text "K" at 4004.04,5551.79 h78.74
  text "F" at 6053.84,5486.43 h78.74
  text "K" at 2884.5,5481.66 h78.74
  text "F" at 2226.73,5474.85 h78.74
  text "F" at 5698.99,5461.01 h78.74
  text "K" at 3042.63,5433.31 h78.74
  text "U" at 6213.72,5433.07 h78.74
  text "V" at 5234.29,5392.13 h78.74
  text "K" at 4191.12,5353.72 h78.74
  text "F" at 2487.44,5336.22 h78.74
  text "K" at 4026.67,5336.44 h78.74
  text "F" at 5821.16,5304.64 h78.74
  text "F" at 2133.57,5299.65 h78.74
  text "F" at 4848.25,5225.75 h78.74
  text "J" at 1853.49,5216.54 h78.74
  text "J" at 5672.39,5187.01 h78.74
  text "V" at 2879.54,5182.64 h78.74
  text "F" at 2394.28,5161.02 h78.74
  text "U" at 5839.71,5137.8 h78.74
  text "F" at 4567.43,5134.5 h78.74
  text "F" at 2040.42,5124.45 h78.74
  text "F" at 3277.86,5088.49 h78.74
  text "V" at 4138.94,5059.25 h78.74
  text "F" at 3570.93,5052.5 h78.74
  text "U" at 1892.86,5049.21 h78.74
  text "F" at 4909.57,5037.03 h78.74
  text "F" at 2301.13,4985.83 h78.74
  text "F" at 4628.74,4945.79 h78.74
  text "J" at 5170.42,4901.57 h78.74
  text "F" at 3253.68,4891.54 h78.74
  text "J" at 2493.25,4881.89 h78.74
  text "M" at 3792.46,4872.05 h78.74
  text "F" at 3546.75,4855.56 h78.74
  text "F" at 4970.89,4848.32 h78.74
  text "U" at 2316.09,4822.83 h78.74
  text "F" at 4690.06,4757.08 h78.74
  text "U" at 5091.68,4744.09 h78.74
  text "J" at 3034.59,4714.57 h78.74
  text "J" at 4481.44,4704.72 h78.74
  text "F" at 3229.49,4694.6 h78.74
  text "F" at 3522.57,4658.61 h78.74
  text "J" at 3723.57,4635.83 h78.74
  text "J" at 3910.57,4635.83 h78.74
  text "U" at 4648.76,4596.46 h78.74
  text "U" at 3133.01,4566.93 h78.74
  text "U" at 3595.61,4507.87 h78.74
  text "Through Holes" at 3284.98,2106.3 h47.24
  text "Symbol" at 1223.3,1917.32 h47.24
  text "Diameter" at 1886.05,1917.32 h47.24
  text "Tolerance" at 2759.34,1917.32 h47.24
  text "Plated" at 3491.21,1917.32 h47.24
  text "Punched" at 3986.53,1917.32 h47.24
  text "HoleName" at 4719.78,1917.32 h47.24
  text "Quantity" at 5523.93,1917.32 h47.24
  text "A" at 1341.68,1775.59 h47.24
  text "0.3500" at 1934.71,1775.59 h47.24
  text "Yes" at 3560.89,1775.59 h47.24
  text "No" at 4104.42,1775.59 h47.24
  text "Rnd 0,35" at 4727.57,1775.59 h47.24
  text "447" at 5639.6,1775.59 h47.24
  text "B" at 1341.68,1681.1 h47.24
  text "0.5000" at 1934.71,1681.1 h47.24
  text "Yes" at 3560.89,1681.1 h47.24
  text "No" at 4104.42,1681.1 h47.24
  text "Rnd 0,5" at 4750.88,1681.1 h47.24
  text "1" at 5688.13,1681.1 h47.24
  text "C" at 1341.68,1586.61 h47.24
  text "0.8000" at 1934.9,1586.61 h47.24
  text "Yes" at 3560.89,1586.61 h47.24
  text "No" at 4104.42,1586.61 h47.24
  text "Rnd 0,8" at 4751.07,1586.61 h47.24
  text "34" at 5663.45,1586.61 h47.24
  text "D" at 1341.68,1492.13 h47.24
  text "1.0000" at 1935.44,1492.13 h47.24
  text "Yes" at 3560.89,1492.13 h47.24
  text "No" at 4104.42,1492.13 h47.24
  text "Rnd 1" at 4794.58,1492.13 h47.24
  text "2" at 5688.13,1492.13 h47.24
  text "E" at 1341.68,1397.64 h47.24
  text "1.1000" at 1936.16,1397.64 h47.24
  text "Yes" at 3560.89,1397.64 h47.24
  text "No" at 4104.42,1397.64 h47.24
  text "Rnd 1,1" at 4752.36,1397.64 h47.24
  text "84" at 5663.57,1397.64 h47.24
  text "F" at 1341.68,1303.15 h47.24
  text "1.3000" at 1935.44,1303.15 h47.24
  text "Yes" at 3560.89,1303.15 h47.24
  text "No" at 4104.42,1303.15 h47.24
  text "Rnd 1,3" at 4751.62,1303.15 h47.24
  text "128" at 5640.33,1303.15 h47.24
  text "G" at 1341.68,1208.66 h47.24
  text "1.4000" at 1935.44,1208.66 h47.24
  text "Yes" at 3560.89,1208.66 h47.24
  text "No" at 4104.42,1208.66 h47.24
  text "Rnd 1.4" at 4751.68,1208.66 h47.24
  text "22" at 5663.45,1208.66 h47.24
  text "H" at 1341.68,1114.17 h47.24
  text "1.5000" at 1935.44,1114.17 h47.24
  text "Yes" at 3560.89,1114.17 h47.24
  text "No" at 4104.42,1114.17 h47.24
  text "Rnd 1,5" at 4751.62,1114.17 h47.24
  text "6" at 5688.13,1114.17 h47.24
  text "J" at 1341.68,1019.68 h47.24
  text "1.6000" at 1935.44,1019.68 h47.24
  text "Yes" at 3560.89,1019.68 h47.24
  text "No" at 4104.42,1019.68 h47.24
  text "Rnd 1,6" at 4751.62,1019.68 h47.24
  text "49" at 5663.45,1019.68 h47.24
  text "K" at 1341.68,925.2 h47.24
  text "1.8000" at 1935.62,925.2 h47.24
  text "Yes" at 3560.89,925.2 h47.24
  text "No" at 4104.42,925.2 h47.24
  text "Rnd 1,8" at 4751.81,925.2 h47.24
  text "64" at 5663.45,925.2 h47.24
  text "L" at 1341.68,830.71 h47.24
  text "2.3000" at 1934.71,830.71 h47.24
  text "Yes" at 3560.89,830.71 h47.24
  text "No" at 4104.42,830.71 h47.24
  text "Rnd 2,3" at 4750.88,830.71 h47.24
  text "2" at 5688.13,830.71 h47.24
  text "M" at 1341.68,736.22 h47.24
  text "3.6000" at 1934.71,736.22 h47.24
  text "Yes" at 3560.89,736.22 h47.24
  text "No" at 4104.42,736.22 h47.24
  text "Rnd 3,6" at 4750.88,736.22 h47.24
  text "8" at 5688.13,736.22 h47.24
  text "N" at 1341.68,641.73 h47.24
  text "4.8000" at 1934.9,641.73 h47.24
  text "Yes" at 3560.89,641.73 h47.24
  text "No" at 4104.42,641.73 h47.24
  text "Rnd 4.8" at 4751.13,641.73 h47.24
  text "1" at 5688.13,641.73 h47.24
  text "P" at 1341.68,547.24 h47.24
  text "0.8000" at 1934.9,547.24 h47.24
  text "No" at 3584.74,547.24 h47.24
  text "No" at 4104.42,547.24 h47.24
  text "Rnd 0,8 Non-Plated" at 4501.51,547.24 h47.24
  text "8" at 5688.13,547.24 h47.24
  text "R" at 1341.68,452.76 h47.24
  text "1.0000" at 1935.44,452.76 h47.24
  text "No" at 3584.74,452.76 h47.24
  text "No" at 4104.42,452.76 h47.24
  text "Rnd 1 Non-Plated" at 4544.86,452.76 h47.24
  text "88" at 5663.68,452.76 h47.24
  text "T" at 1341.68,358.27 h47.24
  text "1.7000" at 1935.44,358.27 h47.24
  text "No" at 3584.74,358.27 h47.24
  text "No" at 4104.42,358.27 h47.24
  text "Rnd 1,7 Non-Plated" at 4502.12,358.27 h47.24
  text "2" at 5688.13,358.27 h47.24
  text "U" at 1341.68,263.78 h47.24
  text "3.0000" at 1934.71,263.78 h47.24
  text "No" at 3584.74,263.78 h47.24
  text "No" at 4104.42,263.78 h47.24
  text "Rnd 3 Non-Plated" at 4544.05,263.78 h47.24
  text "34" at 5663.45,263.78 h47.24
  text "V" at 1341.68,169.29 h47.24
  text "3.1000" at 1935.44,169.29 h47.24
  text "No" at 3584.74,169.29 h47.24
  text "No" at 4104.42,169.29 h47.24
  text "Rnd 3,1 Non-Plated" at 4502.12,169.29 h47.24
  text "16" at 5663.89,169.29 h47.24
  text "W" at 1341.68,74.8 h47.24
  text "3.6000" at 1934.71,74.8 h47.24
  text "No" at 3584.74,74.8 h47.24
  text "No" at 4104.42,74.8 h47.24
  text "Rnd 3,6 Non-Plated" at 4501.3,74.8 h47.24
  text "14" at 5663.89,74.8 h47.24